# Altium PCB PCB Up.PcbDoc
Units mm, origin at the board's own origin, x right, y up, seen from the top; angles counter-clockwise.
Board outline 147.41 x 76.58 mm, 2 copper layers (Top Layer, Bottom Layer); 81 components, 70 nets, 547 pads, 147 vias.
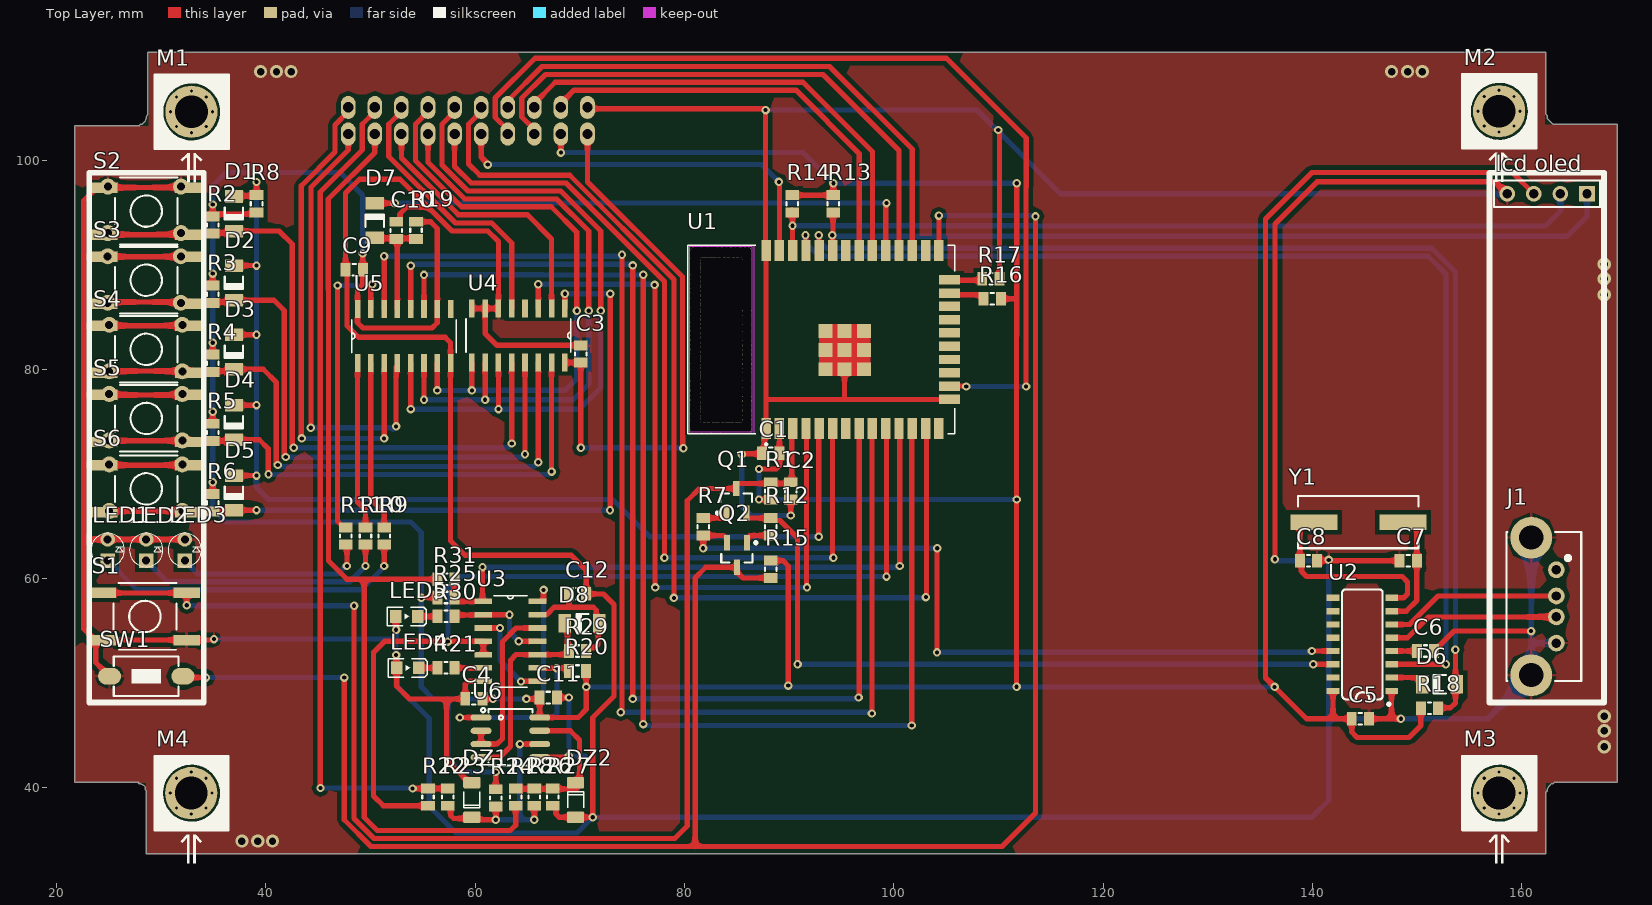
[diagram p0: Top Layer view]
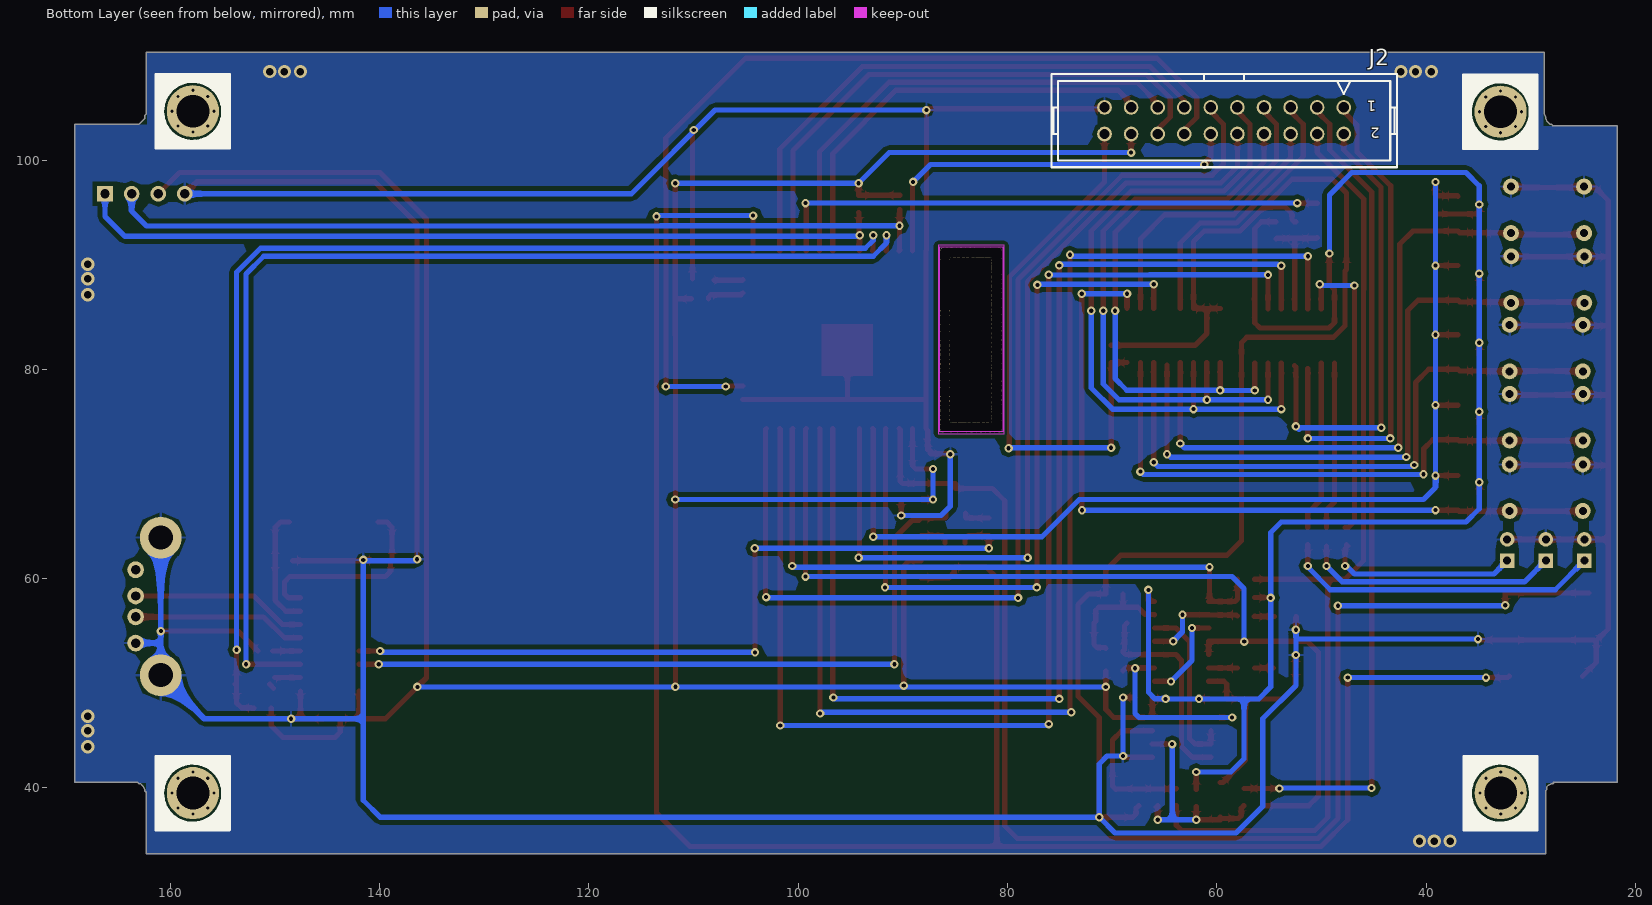
[diagram p1: Bottom Layer view, seen from below]
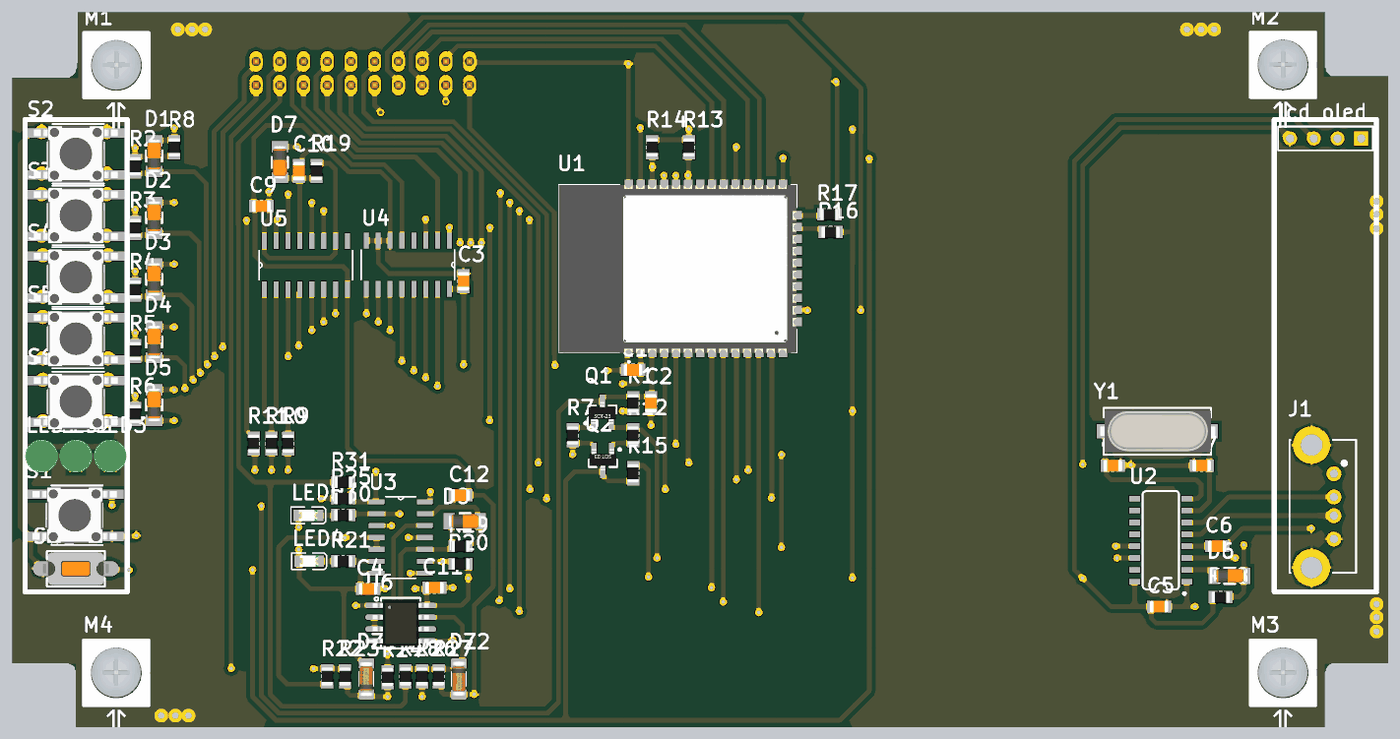
[diagram p2: 3D render of the assembled board from above, using the file's embedded part models]

## Layer stack, top to bottom
Top Solder: solder mask 0.0102, Solder Resist, Dk 3.5
Top Layer: signal copper 0.0356
Dielectric 1: dielectric 0.32, FR-4, Dk 4.8
Bottom Layer: signal copper 0.0356
Bottom Solder: solder mask 0.0102, Solder Resist, Dk 3.5

## Board outline
27.911,40.411 28.048,40.411 28.321,40.275 28.458,40.138 28.458,39.864 28.595,39.727 28.595,33.698 162.306,33.698 162.306,39.587 162.446,39.727 162.446,39.864 162.582,40.138 162.719,40.275 162.856,40.411 162.992,40.411 163.129,40.548 169.156,40.548 169.156,103.431 162.992,103.431 162.856,103.568 162.719,103.704 162.582,103.841 162.446,103.978 162.446,104.252 162.306,104.389 162.306,110.281 28.732,110.281 28.732,104.389 28.595,104.115 28.595,103.978 28.458,103.704 28.321,103.568 28.184,103.431 28.048,103.431 27.911,103.294 21.745,103.294 21.745,40.548 27.774,40.548
cut-out: 86.487,91.693 80.439,91.693 80.439,74.041 86.487,74.041

## Design rules (kind name [scope] priority, off if disabled: settings)
Clearance [All] p1: gap=0.254 ignorepadtopadclearanceinfootprint=FALSE except(0: Arc-Hole Track-Hole SMDPad-Hole THPad-Hole Via-Hole Fill-Hole Poly-Hole Region-Hole Text-Hole; 0.4: Arc-Fill Arc-Poly Arc-Region Track-Fill Track-Poly Track-Region SMDPad-Fill SMDPad-Poly SMDPad-Region THPad-Fill THPad-Poly THPad-Region Via-Fill Via-Poly Via-Region Fill-Fill Fill-Poly Fill-Region Poly-Poly Poly-Region Region-Region)
PolygonConnect [All] p1: connectstyle=Relief reliefconductorwidth=0.254 reliefentries=4 polygonreliefangle="90 Angle" airgapwidth=0.254
RoutingVias [All] p1: holewidth=0.4 width=0.8 viastyle="Through Hole" minholewidth=0.4 minwidth=0.8 maxholewidth=0.4 maxwidth=0.8
SolderMaskExpansion [All] p1: expansion=0.102 istentingtop=FALSE
Width [All] p1: maxlimit=0.5 minlimit=0.5 preferedwidth=0.5 minimp=50.000000 maximp=50.000000 favimp=50.000000
30 further rules are at their usual default settings.

## Components (designator, comment, footprint, x,y, rotation, side; value= is the part's Value field where it differs from the comment)
C1 "100nF" CAP805 89.076,71.98 r180 top
C2 "100nF" CAP805 90.17,69.215 r270 top
C3 "100nF" CAP805 70.104,80.646 r90 top
C4 "100nF" CAP805 60.706,48.514 r180 top
C5 "100nF" CAP805 145.415,46.609 r180 top
C6 "0.1nF" CAP805 151.637,53.086 r180 top
C7 "22pF" CAP805 148.336,61.722 r0 top
C8 "22pF" CAP805 140.462,61.722 r180 top
C9 "100nF" CAP805 49.276,89.535 r180 top
C10 "100nF" CAP805 52.451,94.106 r270 top
C11 "100nF" CAP805 66.168,48.641 r0 top
C12 "33pF" CAP805 68.962,58.547 r0 top value=100nF
D1 "4148" "Diode 1n4148 SMD" 36.957,96.518 r270 top
D2 "4148" "Diode 1n4148 SMD" 36.957,89.914 r270 top
D3 "4148" "Diode 1n4148 SMD" 36.957,83.31 r270 top
D4 "4148" "Diode 1n4148 SMD" 36.957,76.581 r270 top
D5 "4148" "Diode 1n4148 SMD" 36.957,69.848 r270 top
D6 "4148" "Diode 1n4148 SMD" 153.795,49.911 r180 top
D7 "4148" "Diode 1n4148 SMD" 50.419,92.582 r90 top
D8 "4148" "Diode 1n4148 SMD" 71.88,55.753 r180 top
DZ1 "" "SOD80, LL-34" 59.69,38.862 r90 top value=12V
DZ2 "" "SOD80, LL-34" 69.596,38.862 r270 top value=12V
J1 "USB1040-XX-X-X_REVC" GCT_USB1040-XX-X-X_REVC 160.922,57.348 r270 top
J2 "IDC_2X10" IDC_2X10 59.309,103.759 r0 bottom
"lcd oled" "Header 4" HDR1X4 166.243,96.774 r180 top
LED1 "RED" LED3mm_GRN 24.892,62.738 r90 top
LED2 "RED" LED3mm_GRN 28.575,62.738 r90 top
LED3 "RED" LED3mm_GRN 32.258,62.738 r90 top
LED4 "LED RXD2" LED_SMD_0805 53.56,51.473 r180 top
LED5 "LED TXD2" LED_SMD_0805 53.467,56.388 r180 top
M1 "Screw" "Board Screw" 32.893,104.616 r0 top
M2 "Screw" "Board Screw" 157.844,104.665 r0 top
M3 "Screw" "Board Screw" 157.844,39.514 r0 top
M4 "Screw" "Board Screw" 32.876,39.514 r0 top
Q1 "SS8050-G" SOT23_BEC_M 84.963,67.437 r90 top
Q2 "SS8050-G" SOT23_BEC_M 85.024,62.262 r270 top
R1 "10K" RES0805_(2012X06L) 88.265,69.215 r270 top
R2 "10K" RES0805_(2012X06L) 34.925,94.614 r270 top
R3 "10K" RES0805_(2012X06L) 34.925,88.01 r270 top
R4 "10K" RES0805_(2012X06L) 34.925,81.406 r270 top
R5 "10K" RES0805_(2012X06L) 34.925,74.803 r270 top
R6 "10K" RES0805_(2012X06L) 34.925,68.071 r270 top
R7 "10K" RES0805_(2012X06L) 81.788,64.135 r90 top
R8 "10K" RES0805_(2012X06L) 39.116,96.647 r270 top
R9 "2.2K" RES0805_(2012X06L) 51.308,63.246 r90 top
R10 "2.2K" RES0805_(2012X06L) 49.53,63.246 r90 top
R11 "2.2K" RES0805_(2012X06L) 47.625,63.246 r90 top
R12 "10K" RES0805_(2012X06L) 88.265,65.785 r270 top
R13 "10K" RES0805_(2012X06L) 94.234,96.646 r270 top
R14 "10K" RES0805_(2012X06L) 90.297,94.996 r90 top
R15 "10K" RES0805_(2012X06L) 88.265,60.071 r90 top
R16 "10K" RES0805_(2012X06L) 108.585,86.741 r0 top
R17 "10K" RES0805_(2012X06L) 108.459,88.646 r0 top
R18 "" RES0805_(2012X06L) 150.368,47.625 r0 top
R19 "10K" RES0805_(2012X06L) 54.356,94.107 r270 top
R20 "4.6K" RES0805_(2012X06L) 70.611,51.181 r180 top
R21 "2.4K" RES0805_(2012X06L) 58.039,51.473 r180 top
R22 "1K" RES0805_(2012X06L) 55.499,39.952 r270 top
R23 "100" RES0805_(2012X06L) 57.404,39.952 r270 top
R24 "20K" RES0805_(2012X06L) 61.976,38.228 r90 top
R25 "4.6K" RES0805_(2012X06L) 56.389,58.204 r0 top
R26 "120" RES0805_(2012X06L) 65.659,39.952 r270 top
R27 "20K" RES0805_(2012X06L) 67.437,38.302 r90 top
R28 "100" RES0805_(2012X06L) 63.881,38.302 r90 top
R29 "56K" RES0805_(2012X06L) 68.961,53.086 r0 top
R30 "2.4K" RES0805_(2012X06L) 58.039,56.426 r180 top
R31 "1K" RES0805_(2012X06L) 58.039,59.944 r180 top
S1 "KEY_FLASH" SW-PB 28.448,56.388 r180 top
S2 "KEY1" SW-PB 28.575,95.123 r180 top
S3 "KEY1" SW-PB 28.575,88.519 r180 top
S4 "KEY1" SW-PB 28.575,81.915 r180 top
S5 "KEY1" SW-PB 28.575,75.311 r180 top
S6 "KEY1" SW-PB 28.575,68.58 r180 top
SW1 "PUSHBUTTON" SWPBS_SPST_6X3X5 28.575,50.673 r180 top
U1 "ESP32-WROOM-32D" ESP32_WROOM 95.827,81.899 r90 top
U2 "CH340" SO016 144.774,53.721 r90 top
U3 "74HC04" SOIC127P600X175-14N 63.373,54.013 r0 top
U4 "74HC4051D" SOIC127P600X175-16N 64.135,83.236 r270 top
U5 "74HC595D" SOIC127P600X175-16N 53.213,83.185 r90 top
U6 "MAX487CPA" SO_8 63.373,44.831 r0 top
Y1 "XTAL" "Crystal SMD" 144.399,65.405 r180 top

## Footprints (in the part's own frame and the unit in brackets; to place one, negate y for a bottom-side part, rotate by r counter-clockwise, add the part's x,y. Pads: shape width x height; smd on the part's side, far side on the other; paste and mask are expansions set on the pad)
"Board Screw" [mm]
  round 0.6 hole 0.3: S(-2,0) S(-1.414,-1.414) S(-1.414,1.414) S(0,-2) S(0,2) S(1.414,-1.414) S(1.414,1.414) S(2,0)
  round 5 hole 3.15 mask+0.1: S(0,0)
  silkscreen extent -3.49,-6.75 3.56,3.52, body extent -2.67,-2.64 2.69,2.72, height 2.34
CAP805 [mm]
  rect 0.95x1.3 smd: 1(0,0) 2(1.65,0)
  silkscreen extent 0.67,-0.55 0.97,0.55, body extent -0.19,-0.63 1.84,0.63, height 0.65
"Crystal SMD" [mm] "DESIGNER ABBAS BASEREH"
  rect 4.5x1.5 smd: 1(-4.25,0) 2(4.25,0)
  silkscreen extent -5.75,-2.5 5.75,2.5, body extent -6.21,-2.25 6.09,2.25, height 5.18
"Diode 1n4148 SMD" [mm] "Mini MELF SOD-80"
  rect 1.2x1.75 smd: 1(0,0) 2(3.3,0)
  silkscreen extent 1.04,-0.88 2.22,0.87, body extent -0.13,-0.75 3.37,0.75, height 1.55
ESP32_WROOM [mm]
  rect 2x0.9 smd: 1(-7.554,8.02) 2(-7.554,6.75) 3(-7.554,5.48) 4(-7.554,4.21) 5(-7.554,2.94) 6(-7.554,1.67) 7(-7.554,0.4) 8(-7.554,-0.87) 9(-7.554,-2.14) 10(-7.554,-3.41) 11(-7.554,-4.68) 12(-7.554,-5.95) 13(-7.554,-7.22) 14(-7.554,-8.49) 25(9.446,-8.49) 26(9.446,-7.22) 27(9.446,-5.95) 28(9.446,-4.68) 29(9.446,-3.41) 30(9.446,-2.14) 31(9.446,-0.87) 32(9.446,0.4) 33(9.446,1.67) 34(9.446,2.94) 35(9.446,4.21) 36(9.446,5.48) 37(9.446,6.75) 38(9.446,8.02)
  rect 0.9x2 smd: 15(-4.769,-9.49) 16(-3.499,-9.49) 17(-2.229,-9.49) 18(-0.959,-9.49) 19(0.311,-9.49) 20(1.581,-9.49) 21(2.851,-9.49) 22(4.121,-9.49) 23(5.391,-9.49) 24(6.661,-9.49)
  rect 1.33x1.33 smd: 39(-1.889,-1.315) 39(-1.889,0.52) 39(-1.889,2.355) 39(-0.054,2.355) 39(-0.054,0.52) 39(-0.054,-1.315) 39(1.781,-1.315) 39(1.781,0.52) 39(1.781,2.355)
  Keep-Out Layer region: 9.946,9.21 -8.054,9.21 -8.054,15.51 9.946,15.51
  Keep-Out Layer region: 9.946,9.21 -8.054,9.21 -8.054,15.51 9.946,15.51
  silkscreen extent -9.15,-9.99 9.95,15.51, body extent -8.1,-9.95 9.9,15.55, height 3.2
GCT_USB1040-XX-X-X_REVC [mm]
  round 1.6 hole 0.9: 1(-3.5,2.4) 2(-1,2.4) 3(1,2.4) 4(3.5,2.4)
  round 4 hole 2.3: 5(-6.57,0) 6(6.57,0)
  silkscreen extent -7.11,-2.36 7.11,4.78
HDR1X4 [mm] "Connector; Header; 4 Position"
  rect 1.5x1.5 hole 0.9: 1(0,0)
  round 1.5 hole 0.9: 2(2.54,0) 3(5.08,0) 4(7.62,0)
  silkscreen extent -1.27,-1.27 8.89,1.27
IDC_2X10 [mm]
  round 1.4 / inner round 1.4 / far side oval 1.4x2.2 hole 1 mask+0.1: 1(-11.43,-1.27) 2(-11.43,1.27) 3(-8.89,-1.27) 4(-8.89,1.27) 5(-6.35,-1.27) 6(-6.35,1.27) 7(-3.81,-1.27) 8(-3.81,1.27) 9(-1.27,-1.27) 10(-1.27,1.27) 11(1.27,-1.27) 12(1.27,1.27) 13(3.81,-1.27) 14(3.81,1.27) 15(6.35,-1.27) 16(6.35,1.27) 17(8.89,-1.27) 18(8.89,1.27) 19(11.43,-1.27) 20(11.43,1.27)
  silkscreen extent -16.51,-4.44 16.51,4.44, body extent -16.53,-4.42 16.53,4.75, height 9.13
LED3mm_GRN [mil]
  rect 55x55 hole 30: 1(-40,0)
  round 55 hole 30: 2(40,0)
  silkscreen extent -63,-63 63,63, body extent -69,-69 69,69, height 154
LED_SMD_0805 [mm] "SMD Mono-color Chip LED, body 2.0x1.25mm"
  rect 1.1x1.2 smd: 1(-1.05,0) 2(1.05,0)
  silkscreen extent -1.85,-0.88 1.85,0.88, body extent -1,-0.62 1,0.63, height 0.7
RES0805_(2012X06L) [mm] "Chip Resistor, 2-Leads, Body 2.0x1.3mm, IPC High Density _ (0.100 W)"
  rect 0.95x1.3 smd: 1(0,0) 2(1.65,0)
  silkscreen extent 0.67,-0.55 0.97,0.55, body extent -0.19,-0.63 1.84,0.64, height 0.6
SO016 [mm]
  rect 0.6x1.2 smd: 1(-4.445,-2.8) 2(-3.175,-2.8) 3(-1.905,-2.8) 4(-0.635,-2.8) 5(0.635,-2.8) 6(1.905,-2.8) 7(3.175,-2.8) 8(4.445,-2.8) 9(4.445,2.8) 10(3.175,2.8) 11(1.905,2.8) 12(0.635,2.8) 13(-0.635,2.8) 14(-1.905,2.8) 15(-3.175,2.8) 16(-4.445,2.8)
  silkscreen extent -5.84,-2.67 5.26,1.95
SO_8 [mm] "SOP-8, 5x3.9mm body 1.27mm pitch, SOT96-1, M08A, S8, SOIC8, VO8, MS-012AA(JEDEC), R-8, 8S2, VOG8"
  oval 2x0.6 smd: 1(-2.8,1.905) 2(-2.8,0.635) 3(-2.8,-0.635) 4(-2.8,-1.905) 5(2.8,-1.905) 6(2.8,-0.635) 7(2.8,0.635) 8(2.8,1.905)
  silkscreen extent -2.8,-2.7 2.1,2.8, body extent -3,-2.45 3,2.45, height 1.7
"SOD80, LL-34" [mm] "Diode, MiniMELF"
  round 0.5 on Mech15: 0(0,0)
  rrect25% 1.1x1.65 smd: 1(1.65,0) 2(-1.65,0)
  silkscreen extent -0.76,-0.76 0.76,0.76, body extent -1.88,-0.8 1.82,0.8, height 1.6
SOIC127P600X175-14N [mil]
  rect 67x21 smd: 1(-102,150) 2(-102,100) 3(-102,50) 4(-102,0) 5(-102,-50) 6(-102,-100) 7(-102,-150) 8(102,-150) 9(102,-100) 10(102,-50) 11(102,0) 12(102,50) 13(102,100) 14(102,150)
  silkscreen extent -63,-172 63,172
SOIC127P600X175-16N [mil]
  rect 67x21 smd: 1(-102,175) 2(-102,125) 3(-102,75) 4(-102,25) 5(-102,-25) 6(-102,-75) 7(-102,-125) 8(-102,-175) 9(102,-175) 10(102,-125) 11(102,-75) 12(102,-25) 13(102,25) 14(102,75) 15(102,125) 16(102,175)
  silkscreen extent -62,-197 62,197
SOT23_BEC_M [mm] "SOT23, 3-Leads, Body 2.9x1.3mm, Pitch 0.95mm, Lead Span 2.4mm, IPC Low Density"
  rect 1.45x0.6 smd: 1(-1.175,0.95) 2(-1.175,-0.95) 3(1.175,0)
  silkscreen extent -1.3,-1.5 0.7,1.92, body extent -1.23,-1.45 1.07,1.45, height 1
SW-PB [mm]
  rect 2.5x1 smd: 1(-3.992,2.25) 1(3.992,2.25) 2(-3.992,-2.25) 2(3.992,-2.25)
  silkscreen extent -3,-3.2 3,3.18, body extent -4.5,-3 4.5,3, height 5
SWPBS_SPST_6X3X5 [mm] "SWITCH, PUSHBUTTON, SMD, SPST, 6X3.5mm, SKQMBBE010, 50000 Cycles, 1.57N Force"
  oval 2.2x1.6 smd mask+0.1: 1(-3.5,0) 2(3.5,0)
  silkscreen extent -3.1,-1.9 3.1,1.9, body extent -3.65,-1.75 3.65,1.75, height 5

## Part data
C1 C2 C3 C4 C9 C10 C11 C12: library part "CAP SMD PACKAGE", "TOTAL CAPACITOR SMD PACK", Data=2017-3-10, Desc.="CAP SMD TOTAL PACKAGES", Designer="Abbas Basereh"
C5 C6 C7 C8: library part Cap-Bipolar, "Bipolar Capacitor", Voltage=100V, Adding Date=1387/12/20, Designer="Saeid Jorablo", Organazation=ControTec
D1 D2 D3 D4 D5 D6 D7 D8: library part Diode, "Default Diode", Code_JEDEC=DO-214-AB, LatestRevisionDate=17-Jul-2002, LatestRevisionNote="Re-released for DXP Platform.", PackageDescription="DO-214-AB/SMC; 2 C-Bend Leads; Body 7.9 x 5.9 mm, inc. leads (LxW)", PackageReference=SMC, PackageVersion=Sep-1996, Published=8-Jun-2000, Publisher="Altium Limited"
DZ1 DZ2: library part "ZENER GENERAL DIODE", "DIODE ZENER GENERAL", ComponentLink1Description="Manufacturer Link", ComponentLink2Description=Datasheet, PackageDescription="DIODE GEN ZENER", PackageReference="DO 35", PackageVersion=2017-1-12, Published=2017-1-12, Publisher="Abbas Basereh"
J1: "USB-A _USB TYPE-A_ USB 2.0 Receptacle Connector 4 Position Through Hole", Package=None, Availability=Unavailable, MF="Global Connector Technology", MP=USB1040-GF-L-B, Price=None, SnapEDA_Link=https://www.snapeda.com/parts/USB1040-GF-L-B/Global%20Connector%20Technology/view-part/812880/?ref=snap
J2: "CONN, IDC, Male, pitch: 2.54mm, 20POS"
"lcd oled": "Header, 4-Pin", LatestRevisionDate=17-Jul-2002, LatestRevisionNote="Re-released for DXP Platform.", Publisher="Altium Limited"
LED1 LED2 LED3 LED4 LED5: library part LED, "LED", Adding Date=1387/12/22, Designer="Saeid Jorablo", Organazation=ControTec, Size="SMD 1206"
  LED1 LED2 LED3: Color=RED
  LED4: Color="LED RXD2"
  LED5: Color="LED TXD2"
M1 M2 M3 M4: library part "Board Screw 3MM", "Board Screw With Spacer"
Q1 Q2: "Bipolar _BJT_ Transistor NPN 25V 1.5A 100MHz 300mW Surface Mount SOT-23", Package="TO-236 Comchip", Availability=Unavailable, MF="Comchip Technology", MP=SS8050-G, Price=None, SnapEDA_Link=https://www.snapeda.com/parts/SS8050-G/Comchip%20Technology/view-part/809142/?ref=snap
R1 R2 R3 R4 R5 R6 R7 R8 R12 R13 R14 R15 R16 R17 R19 R20 R21 R22 R23 R24 R25 R26 R27 R28 R29 R30 R31: library part "RES SMD PACKAGE", "TOTAL SMD RESISTOR PACK", Data=2017-3-10, Desc.="RES SMD PAKAGES", Designer="Abbas Basereh"
R9 R10 R11 R18: library part "RES SMD PACKAGE", "TOTAL SMD RESISTOR PACK(1206)", Data=2017-3-10, Desc.="RES SMD PAKAGES", Designer="Abbas Basereh"
S1 S2 S3 S4 S5 S6: library part PB-2pin, "Switch", Designer="Seyed Mohsen Ghasemian", E-mail=picpars@gmail.com, Publisher=www.picpars.com, WEB=www.picpars.com
SW1: library part SWPBS_SPST_6X3_222BMVBAR, "SWITCH, PUSH BUTTON, TACTILE, SMD, SPST, 6X3.5X5mm", =http://www.chila.ir, ASSEMBLY=ASSEMBLY, DESC=DESCRIPTION, MANF=CTS, MANF_P#=222BMVBAR, PARAM=PARAM, Price=PRICE
U1: "IC: SoC; GPIO, I2C, I2S, IR, SD, SDIO, SPI, UART; 2.7÷3.6VDC; 20dBm", Package="Module Espressif Systems", Availability=Unavailable, MF="Espressif Systems", MP=ESP32-WROOM-32D, Price=None, SnapEDA_Link=https://www.snapeda.com/parts/ESP32-WROOM-32D/Espressif%20Systems/view-part/?ref=snap
U2: Package=None, Availability=Unavailable, MF="Seeed Technology", MP=CH340, Price=None, SnapEDA_Link=https://www.snapeda.com/parts/CH340/Seeed%20Technology%20Co.%2C%20Ltd/view-part/?ref=snap
U3: library part NOTx6_SN74HC04, "Inverter IC Logic-level 6 section SOP-14 SMD", MANF="Texas Instruments", MANF_P#=SN74HC04NSR, PARAM="5.2mA, 5.2mA", PARAM2="2 V ~ 6 V"
U4: "Single 8-Channel Analog Multiplexer/Demultiplexer, VCC=2 to 6V, PD=500mW, tpd/tpz=15ns_typ._", Package="SOIC-16 Toshiba", Availability=Unavailable, MF="Toshiba Semiconductor", MP=74HC4051D, Price=None, SnapEDA_Link=https://www.snapeda.com/parts/74HC4051D/Toshiba%20Semiconductor%20and%20Storage/view-part/?ref=snap
U5: "Shift Register Single 8-Bit Serial to Serial/Parallel 16-Pin SO", Package="SO-16 NXP Semiconductors", Availability=Good, MF="Toshiba Semiconductor", MP=74HC595D, Price="0.21 USD", SnapEDA_Link=https://www.snapeda.com/parts/74HC595D/Toshiba%20Semiconductor%20and%20Storage/view-part/?ref=snap
U6: "Low-Power, Slew-Rate-Limited RS-485/RS-422 Transceiver", Code_JEDEC=MS-001-AB, ComponentLink1Description="Manufacturer Link", ComponentLink1URL=http://www.maxim-ic.com/, ComponentLink2Description=Datasheet, ComponentLink2URL=http://pdfserv.maxim-ic.com/en/ds/MAX1487-MAX491.pdf, DatasheetVersion=Feb-1996, LatestRevisionDate=29-May-2009, LatestRevisionNote="Component Body Added.", PackageDescription="DIP, 8-Pin, Row Spacing 7.62 mm, Pitch 2.54 mm", PackageReference=PA8, PackageVersion="RevB, 21-0043", Published=16-Jan-2001, Publisher="Altium Limited"
Y1: "Crystal Oscillator", LatestRevisionDate=17-Jul-2002, LatestRevisionNote="Re-released for DXP Platform.", PackageDescription="Crystal, Thru-Hole; 2 Leads; Body 3.1 x 8.2 mm (Dia.xH)", PackageReference=R38, Published=8-Jun-2000, Publisher="Altium Limited"

## Free pads (board coordinates)
  round 1 hole 1: 0(81.026,74.422) 0(81.026,74.549) 0(81.026,74.676) 0(81.026,74.93) 0(81.026,75.311) 0(81.026,75.565) 0(81.026,75.565) 0(81.026,75.946) 0(81.026,76.2) 0(81.026,76.454) 0(81.026,76.454) 0(81.026,76.835) 0(81.026,77.343) 0(81.026,77.343) 0(81.026,77.724) 0(81.026,78.232) 0(81.026,78.232) 0(81.026,78.613) 0(81.026,79.121) 0(81.026,79.375) 0(81.026,79.502) 0(81.026,79.502) 0(81.026,79.756) 0(81.026,80.137) 0(81.026,80.391) 0(81.026,80.391) 0(81.026,80.772) 0(81.026,81.026) 0(81.026,81.28) 0(81.026,81.28) 0(81.026,81.661) 0(81.026,82.169) 0(81.026,82.169) 0(81.026,82.55) 0(81.026,83.058) 0(81.026,83.058) 0(81.026,83.439) 0(81.026,83.947) 0(81.026,84.328) 0(81.026,84.709) 0(81.026,84.836) 0(81.026,85.09) 0(81.026,85.471) 0(81.026,85.725) 0(81.026,85.725) 0(81.026,86.106) 0(81.026,86.233) 0(81.026,86.36) 0(81.026,86.614) 0(81.026,86.614) 0(81.026,86.614) 0(81.026,86.995) 0(81.026,87.122) 0(81.026,87.503) 0(81.026,87.503) 0(81.026,87.503) 0(81.026,87.503) 0(81.026,87.884) 0(81.026,88.011) 0(81.026,88.392) 0(81.026,88.392) 0(81.026,88.392) 0(81.026,88.392) 0(81.026,88.773) 0(81.026,88.9) 0(81.026,89.281) 0(81.026,89.281) 0(81.026,89.281) 0(81.026,89.535) 0(81.026,89.662) 0(81.026,89.789) 0(81.026,89.916) 0(81.026,90.17) 0(81.026,90.17) 0(81.026,90.424) 0(81.026,90.805) 0(81.026,90.805) 0(81.026,91.059) 0(81.026,91.186) 0(81.026,91.186) 0(81.153,91.186) 0(81.407,74.422) 0(81.407,91.186) 0(81.788,91.186) 0(81.915,74.422) 0(82.042,91.186) 0(82.042,91.186) 0(82.296,74.422) 0(82.296,74.422) 0(82.423,91.186) 0(82.677,91.186) 0(82.804,74.422) 0(82.931,91.186) 0(82.931,91.186) 0(83.185,74.422) 0(83.185,74.422) 0(83.312,91.186) 0(83.693,74.422) 0(83.82,91.186) 0(83.82,91.186) 0(84.074,74.422) 0(84.074,74.422) 0(84.201,91.186) 0(84.328,74.422) 0(84.582,74.422) 0(84.709,91.186) 0(84.709,91.186) 0(84.963,74.422) 0(84.963,74.422) 0(85.09,91.186) 0(85.217,74.422) 0(85.598,74.422) 0(85.598,91.186) 0(85.852,74.422) 0(85.979,74.422) 0(85.979,74.549) 0(85.979,74.93) 0(85.979,75.438) 0(85.979,75.819) 0(85.979,75.819) 0(85.979,76.327) 0(85.979,76.708) 0(85.979,76.708) 0(85.979,77.216) 0(85.979,77.597) 0(85.979,77.597) 0(85.979,77.851) 0(85.979,78.105) 0(85.979,78.486) 0(85.979,78.486) 0(85.979,78.74) 0(85.979,79.121) 0(85.979,79.375) 0(85.979,79.502) 0(85.979,79.883) 0(85.979,80.264) 0(85.979,80.772) 0(85.979,81.153) 0(85.979,81.153) 0(85.979,81.661) 0(85.979,82.042) 0(85.979,82.042) 0(85.979,82.55) 0(85.979,82.931) 0(85.979,82.931) 0(85.979,83.185) 0(85.979,83.439) 0(85.979,83.82) 0(85.979,83.82) 0(85.979,84.074) 0(85.979,84.455) 0(85.979,84.709) 0(85.979,84.836) 0(85.979,84.963) 0(85.979,85.344) 0(85.979,85.852) 0(85.979,86.106) 0(85.979,86.233) 0(85.979,86.233) 0(85.979,86.487) 0(85.979,86.741) 0(85.979,86.995) 0(85.979,87.122) 0(85.979,87.122) 0(85.979,87.376) 0(85.979,87.376) 0(85.979,87.63) 0(85.979,87.884) 0(85.979,88.011) 0(85.979,88.011) 0(85.979,88.265) 0(85.979,88.265) 0(85.979,88.265) 0(85.979,88.519) 0(85.979,88.773) 0(85.979,88.9) 0(85.979,88.9) 0(85.979,89.154) 0(85.979,89.154) 0(85.979,89.154) 0(85.979,89.408) 0(85.979,89.535) 0(85.979,89.662) 0(85.979,89.789) 0(85.979,89.916) 0(85.979,90.043) 0(85.979,90.043) 0(85.979,90.297) 0(85.979,90.678) 0(85.979,90.932) 0(85.979,91.059) 0(85.979,91.186)
  round 1.524 hole 0.762: 2(24.892,90.805) 2(24.911,97.466) 2(25.038,70.923) 2(25.038,77.654) 2(25.038,84.258) 3(31.877,90.805) 3(31.896,97.466) 3(32.023,70.923) 3(32.023,77.654) 3(32.023,84.258) 4(24.892,86.36) 4(24.911,93.021) 4(25.038,66.478) 4(25.038,73.209) 4(25.038,79.813) 5(31.877,86.36) 5(31.896,93.021) 5(32.023,66.478) 5(32.023,73.209) 5(32.023,79.813)

## Via types
v1: diameter 0.8, hole 0.4, Top Layer to Bottom Layer, 132 vias
v2: diameter 1.27, hole 0.711, Top Layer to Bottom Layer, 15 vias

## Nets (pads, with @x,y where several pads share a name; then routed paths per layer and width w, separated by ;. In a path a pad name is that pad's centre, name@x,y a point inside that pad or via, vN(x,y) a via of type N, cw(c..) or ccw(c..) an arc to the next point about the centre after c; other vN are vias at no path point)
3V3: "lcd oled.3" C1.1 C4.1 C5.2 C9.1 C11.1 J2.18 R1.2 R2.1 R3.1 R4.1 R5.1 R6.1 R8.2 R13.1 R14.2 R15.2 R16.2 R18.1 R19.1 R20.1 R24.2 R25.1 U1.2 U2.16 U3.14 U5.10 U5.16 U6.8 | length 483.6
  Top Layer w0.5: R6.1 v1(34.925,69.215) ; R5.1 v1(34.925,75.946) ; R4.1 v1(34.925,82.55) ; R3.1 v1(34.925,89.154) ; v1(34.925,95.758) R2.1 35.15,94.839 38.958,94.839 R8.2 ; v1(49.253,91.074) 49.264,91.062 49.264,89.547 C9.1 49.261,89.52 49.261,88.131 48.768,87.638 U5.16 48.768,84.455 49.276,83.947 55.88,83.947 56.388,84.455 56.388,93.472 55.753,94.107 R19.1 ; v1(54.864,58.166) 54.902,58.204 R25.1 ; C4.1 C4.1 v1(61.707,48.514) ; R24.2 v1(61.976,41.529) ; v1(64.897,48.514) 66.041,48.514 C11.1 ; U3.14 66.531,57.823 66.548,57.84 v1(66.548,58.928) ; C11.1@66.173,48.387 U6.8 69.85,46.736 70.611,47.497 R20.1 ; v1(68.199,100.711) J2.18 ; v1(87.122,67.564) 88.263,67.565 R1.2 ; v1(87.122,70.485) 88.773,70.485 89.077,70.789 89.077,71.979 C1.1 ; R15.2 89.409,61.721 89.916,61.214 v1(89.916,49.784) ; C1.1@89.077,72.234 U1.2 ; R14.2 R13.1 v1(94.234,97.79) ; R16.2 111.76,86.741 ; v1(111.745,49.672) 111.745,83.244 111.76,83.259 111.76,86.741 ; v1(111.76,97.79) 111.76,86.741 ; U2.16 141.974,46.609 ; R18.1 150.368,45.974 149.225,44.831 144.272,44.831 143.765,45.338 C5.2 141.974,46.609 ; 161.163,96.774 159.131,98.806 139.954,98.806 135.517,94.369 135.517,50.538 139.446,46.609 141.974,46.609
  Bottom Layer w0.5: v1(49.253,91.074) 49.253,96.67 47.117,98.806 36.195,98.806 34.925,97.536 v1(34.925,95.758) v1(34.925,89.154) v1(34.925,82.55) v1(34.925,75.946) v1(34.925,69.215) 34.925,66.675 36.195,65.405 53.848,65.405 54.864,64.389 v1(54.864,58.166) 54.864,49.657 56.007,48.514 57.404,48.514 ; v1(61.976,41.529) 58.674,41.529 57.404,42.799 57.404,48.514 ; v1(66.548,58.928) 66.548,49.149 65.913,48.514 v1(64.897,48.514) v1(61.707,48.514) 57.404,48.514 ; v1(68.199,100.711) 91.313,100.711 v1(94.234,97.79) v1(111.76,97.79) ; v1(70.612,49.657) v1(136.398,49.657) ; v1@87.122,70.358 v1(87.122,67.564) v1(111.76,67.564)
5V: C3.1 J2.20 U4.16 | length 53.3
  Top Layer w0.5: U4.16 U4.16 C3.1 v1(70.104,72.517) ; J2.20 70.739,97.917 79.813,88.843 79.813,73.636 79.841,73.609 79.841,72.517 v1(79.898,72.46)
  Bottom Layer w0.5: v1(70.104,72.517) 79.841,72.517 v1(79.898,72.46)
4051_CT_Output: J2.10 U1.6 | length 82.6
  Top Layer w0.5: J2.10 58.039,99.391 59.632,97.798 68.699,97.798 78.098,88.399 78.098,62.028 78.09,62.02 v1(78.09,62.006) ; U1.6 94.157,62.083 v1(94.234,62.006)
  Bottom Layer w0.5: v1(78.09,62.006) 94.174,62.006 94.204,61.976 v1(94.234,62.006)
4051_Interrupt_Output: U1.4 U4.3 | length 72.1
  Top Layer w0.5: U4.3 v1(66.04,88.138) ; v1(77.148,88.07) 77.186,88.033 77.186,59.197 v1(77.216,59.167) ; U1.4 91.663,74.299 91.663,59.213 v1(91.709,59.167)
  Bottom Layer w0.5: v1(66.04,88.138) 77.014,88.138 77.082,88.07 v1(77.148,88.07) ; v1(77.216,59.167) 77.231,59.182 77.246,59.167 v1(91.709,59.167)
A: J2.9 U4.11 U5.5 | length 66.5
  Top Layer w0.5: v1(53.848,76.2) U5.5 ; J2.9 58.039,104.629 56.835,103.425 56.835,99.528 59.319,97.044 68.183,97.044 72.009,93.218 v1(72.009,85.598) ; v1(62.23,76.2) U4.11
  Bottom Layer w0.5: v1(53.848,76.2) v1(62.23,76.2) 69.977,76.2 72.009,78.232 v1@72.009,85.471
B: J2.8 U4.10 U5.6 | length 58.6
  Top Layer w0.5: v1(55.118,77.104) U5.6 ; J2.8 55.499,99.798 59.007,96.29 67.794,96.29 70.866,93.218 v1(70.866,85.598) ; v1(60.96,77.104) U4.10
  Bottom Layer w0.5: v1(55.118,77.104) 55.133,77.089 60.945,77.089 v1(60.96,77.104) 69.357,77.104 70.866,78.613 v1@70.866,85.439
"Boost control": J2.16 U1.28 | length 53.5
  Top Layer w0.5: J2.16 65.659,102.926 64.455,104.13 64.455,105.928 66.715,108.188 93.234,108.188 100.507,100.915 U1.28
C: J2.7 U4.9 U5.7 | length 56.9
  Top Layer w0.5: J2.7 55.499,104.629 54.295,103.425 54.295,99.936 58.695,95.536 67.278,95.536 69.723,93.091 v1(69.723,85.598) ; v1(56.388,77.993) U5.7 ; v1(59.69,77.993) U4.9
  Bottom Layer w0.5: v1(56.388,77.993) v1(59.69,77.993) 59.933,77.993 59.948,78.008 68.61,78.008 69.723,79.121 v1(69.723,85.598)
CS: J2.11 U1.13 | length 100.8
  Top Layer w0.5: J2.11 60.579,104.629 59.375,103.425 59.375,99.629 60.452,98.552 69.038,98.552 78.994,88.596 v1(78.994,58.166) ; U1.13 103.124,74.268 103.124,58.293 v1(103.073,58.242)
  Bottom Layer w0.5: v1(78.994,58.166) 102.997,58.166 v1(103.073,58.242)
D_N: J1.2 U2.6 | length 16.9
  Top Layer w0.5: U2.6 149.302,55.626 152.024,58.348 J1.2
D_P: J1.3 U2.5 | length 16.6
  Top Layer w0.5: U2.5 149.098,54.356 151.09,56.348 J1.3
DIN: J2.12 U1.37 | length 38.1
  Top Layer w0.5: J2.12 60.579,100.284 61.214,99.649 v1(61.214,99.568) ; U1.37 v1@89.077,97.74
  Bottom Layer w0.5: v1(61.214,99.568) 87.376,99.568 v1(89.027,97.917)
DIn1: J2.5 U4.5 | length 26.6
  Top Layer w0.5: J2.5 52.959,104.629 51.755,103.425 51.755,100.343 58.118,93.98 61.595,93.98 63.5,92.075 U4.5
DIn2: J2.6 U4.2 | length 26.5
  Top Layer w0.5: J2.6 52.959,100.205 58.382,94.782 64.984,94.782 67.31,92.456 U4.2
DOUT: J2.17 U1.31 | length 41.2
  Top Layer w0.5: J2.17 68.199,105.429 69.45,106.68 90.654,106.68 96.697,100.637 U1.31
Dout1: J2.1 U5.3 | length 48.1
  Top Layer w0.5: v1(43.434,73.406) 43.397,73.443 43.397,97.549 46.609,100.761 46.609,103.359 47.879,104.629 J2.1 ; U5.3@51.304,80.09 51.308,80.086 v1(51.308,73.406)
  Bottom Layer w0.5: v1(43.434,73.406) v1(51.308,73.406)
Dout2: J2.2 U5.4 | length 43.7
  Top Layer w0.5: v1(44.301,74.422) 44.323,74.444 44.323,97.409 47.879,100.965 J2.2 ; v1(52.451,74.549) 52.451,80.213 U5.4@52.578,80.34
  Bottom Layer w0.5: v1(44.301,74.422) 51.978,74.422 52.151,74.249 v1(52.451,74.549)
DS: U1.9 U5.14 | length 122.9
  Top Layer w0.5: U5.14 v1(51.308,90.805) ; v1(73.914,47.244) 73.914,47.325 74.041,47.452 v1(74.041,90.947) ; v1(97.917,47.117) 97.917,74.295 U1.9
  Bottom Layer w0.5: v1(51.308,90.805) 73.818,90.805 73.96,90.947 v1(74.041,90.947) ; v1(73.914,47.244) 97.79,47.244 v1(97.917,47.117)
DTR: Q2.2 R7.1 U2.13 | length 74.3
  Top Layer w0.5: v1(81.788,62.91) R7.1 83.731,64.135 83.954,63.912 84.024,63.912 84.074,63.862 Q2.2 ; v1(104.14,52.959) 104.14,62.882 v1(104.168,62.91) ; v1(139.954,53.086) U2.13
  Bottom Layer w0.5: v1(81.788,62.91) v1(104.168,62.91) ; v1(104.14,52.959) 139.827,52.959 v1(139.954,53.086)
EN: C2.1 Q1.3 R1.1 S1.2 U1.3 | length 125.9
  Top Layer w0.5: S1.2@24.456,58.638 32.44,58.638 v1(32.44,57.459) ; v1(48.435,57.404) 48.435,37.086 50.342,35.179 79.071,35.179 80.272,36.38 80.272,67.445 81.439,68.612 Q1.3 84.988,68.637 84.988,69.062 85.013,69.087 85.438,69.087 85.439,69.088 88.265,69.088 90.043,69.088 C2.1 90.259,69.304 90.259,74.257 U1.3
  Bottom Layer w0.5: v1(32.44,57.459) 32.385,57.404 v1(48.435,57.404)
EN_74595: D7.2 U1.29 | length 53.4
  Top Layer w0.5: D7.2 v1(52.321,95.882) ; U1.29 v1@99.237,95.885
  Bottom Layer w0.5: v1(52.321,95.882) 52.324,95.885 v1(99.314,95.885)
GND: "lcd oled.4" C1.2 C2.2 C3.2 C4.2 C5.1 C6.1 C7.1 C8.1 C9.2 C10.1 C11.2 C12.2 DZ1.1 DZ2.1 J1.4 J1.5 J1.6 J2.19 LED1.2 LED2.2 LED3.2 LED4.2 LED5.2 pad.2 pad.3 R17.2 R27.1 S1.1 S2.2 S3.2 S4.2 S5.2 S6.2 SW1.2 U1.1 U1.15 U1.38 U1.39 U2.1 U3.7 U4.6 U4.7 U4.8 U5.8 U6.5 | length 745.3
  Top Layer w0.5: SW1.2 25.073,50.673 24.565,51.181 24.565,51.183 23.749,51.999 S1.1@23.749,53.888 ; LED3.2 LED2.2 LED1.2 22.606,63.754 ; S6.2@32.567,70.83 24.583,70.83 22.642,70.83 22.606,70.866 ; S5.2@32.567,77.561 24.583,77.561 22.697,77.561 22.606,77.47 ; S4.2@32.567,84.165 24.583,84.165 22.697,84.165 22.606,84.074 ; S3.2@32.567,90.769 24.583,90.769 22.697,90.769 22.606,90.678 ; S2.2@32.567,97.373 24.583,97.373 23.833,97.373 22.606,96.146 22.606,90.678 ; v1(35.052,54.229) 34.961,54.138 32.44,54.138 24.456,54.138 23.999,54.138 S1.1@23.749,53.888 ; LED5.2 52.434,56.371 52.434,55.135 v1(52.451,55.118) ; v1(52.451,52.705) 52.48,52.676 52.48,51.561 52.451,51.532 LED4.2 52.51,49.725 53.721,48.514 57.277,48.514 ; C10.1 52.607,94.106 52.832,94.331 52.832,94.869 53.467,95.504 55.499,95.504 ; DZ1.1 59.415,40.512 59.115,40.812 59.115,40.834 57.277,42.672 57.277,48.514 ; U4.8 U4.7 ; U3.7 59.349,50.203 59.056,49.91 C4.2 57.277,48.514 ; U6.5 68.834,42.926 v1(68.961,43.053) ; R27.1 67.503,38.302 67.728,38.077 67.728,37.504 68.021,37.211 v1(71.247,37.211) 71.247,46.736 73.279,48.768 73.279,57.531 72.263,58.547 C12.2 70.612,60.833 69.215,62.23 59.055,62.23 57.658,63.627 U5.8 57.658,82.55 57.15,83.058 48.884,83.058 47.767,84.175 47.767,89.394 C9.2 47.626,96.852 48.945,98.171 52.832,98.171 55.499,95.504 ; C11.2 v1(68.961,48.641) ; C3.2 62.103,82.296 60.96,83.439 U4.7 ; J2.19 70.866,104.902 87.549,104.902 87.676,104.775 v1(87.757,104.775) 87.757,91.395 U1.38 87.807,77.089 ; v1(85.471,71.882) 85.52,71.931 87.377,71.931 C1.2 ; C1.2@87.349,72.205 C1.2@87.524,72.38 ; C1.2@87.63,72.321 87.63,74.168 U1.1 87.807,77.089 ; v1(90.17,66.04) C2.2 ; U1.39@93.472,80.01 93.472,81.845 U1.39@95.307,81.845 ; U1.39@93.472,83.68 U1.39@95.307,83.68 ; U1.39@97.142,80.01 U1.39@95.307,80.01 ; U1.39@97.142,81.845 97.142,83.68 U1.39@95.307,83.68 ; U1.15 95.123,77.13 ; v1(109.982,102.87) 110.109,102.743 R17.2 ; v1(136.421,61.849) 136.421,93.876 140.462,97.917 157.48,97.917 158.623,96.774 ; v1(141.569,61.792) 140.843,61.792 140.913,61.722 C7.1 ; C5.1 147.574,46.609 ; U2.1 147.574,46.609 ; v1(148.463,46.609) 147.574,46.609 ; C6.1 153.542,54.991 v1(160.909,54.991) ; 22.606,63.754 22.606,70.866 ; 22.606,63.754 22.606,55.206 23.424,54.388 23.456,54.388 23.749,54.094 S1.1@23.749,53.888 ; 22.606,70.866 22.606,77.47 ; 22.606,77.47 22.606,84.074 ; 22.606,84.074 22.606,90.678 ; 55.499,95.504 57.785,93.218 61.214,93.218 62.23,92.202 U4.6 U4.7 ; 87.807,77.089 87.848,77.13 95.123,77.13 ; 95.123,77.13 95.307,77.314 U1.39@95.307,80.01 ; U1.39@95.307,80.01 U1.39@95.307,81.845 ; U1.39@95.307,81.845 U1.39@95.307,83.68
  Bottom Layer w0.5: v1(35.052,54.229) 52.324,54.229 52.451,54.356 ; v1(52.451,55.118) 52.451,54.356 ; v1(68.961,48.641) v1(68.961,43.053) 70.485,43.053 71.247,42.291 v1(71.247,37.211) ; v1(85.471,71.882) 85.471,66.929 86.36,66.04 v1(90.17,66.04) ; v1(87.757,104.775) 107.95,104.775 115.951,96.774 158.623,96.774 ; v1(136.421,61.849) 136.502,61.849 136.629,61.722 141.393,61.722 141.462,61.792 v1(141.569,61.792) 141.569,46.609 ; J1.5 160.922,54.991 160.922,53.848 ; J1.4 160.922,53.848 ; 52.451,54.356 v1(52.451,52.705) 52.451,49.784 55.626,46.609 55.626,38.227 58.166,35.687 69.723,35.687 v1(71.247,37.211) ; v1(71.247,37.211) 139.954,37.211 141.569,38.826 141.569,46.609 ; 141.569,46.609 v1(148.463,46.609) 156.753,46.609 J1.6 160.922,53.848
GPIO_0: Q2.3 R15.1 SW1.1 U1.25 | length 201.1
  Top Layer w0.5: SW1.1 32.202,50.546 v1(34.29,50.546) ; v1(47.498,50.546) 47.498,36.957 50.038,34.417 81.026,34.417 ; R15.1 85.598,60.071 85.074,60.595 85.074,61.037 Q2.3 82.042,61.087 81.026,60.071 81.026,34.417 ; U1.25 v1(104.317,94.692) ; v1(113.553,94.615) 113.553,37.607 110.363,34.417 81.026,34.417
  Bottom Layer w0.5: v1(34.29,50.546) v1(47.498,50.546) ; v1(104.317,94.692) 113.461,94.692 113.538,94.615 v1(113.553,94.615)
GPIO_2: R17.1 U1.24 | length 2.7
  Top Layer w0.5: U1.24 105.358,88.519 R17.1@108.023,88.519
GPIO_15: R16.1 U1.23 | length 3.6
  Top Layer w0.5: U1.23 105.485,87.122 108.36,87.122 108.585,86.897 R16.1
"Interrupt Key": D1.1 D2.1 D3.1 D4.1 D5.1 R8.1 U1.5 | length 107.3
  Top Layer w0.5: D5.1 v1(39.114,69.848) ; D4.1 v1(39.116,76.581) ; D3.1 v1(39.114,83.31) ; D2.1 39.114,89.914 v1(39.116,89.916) ; D1.1 37.021,96.582 39.051,96.582 R8.1 v1(39.116,97.902) ; v1(92.837,64.008) 92.837,74.295 U1.5
  Bottom Layer w0.5: v1(39.114,69.848) v1@39.116,69.85 ; v1(39.114,83.31) v1@39.116,83.312 ; v1(39.116,97.902) v1@39.116,83.312 ; v1(92.837,64.008) 76.708,64.008 73.152,67.564 40.259,67.564 39.116,68.707 v1@39.116,69.85 ; v1@39.116,69.85 v1(39.116,76.581) v1@39.116,83.312
IRQ: J2.13 U1.27 | length 53.6
  Top Layer w0.5: J2.13 63.119,105.664 66.397,108.942 93.877,108.942 101.777,101.042 U1.27
Key1: D1.2 pad.4@24.911,93.021 pad.5@31.896,93.021 R2.2 S2.1 U4.12 | length 66.9
  Top Layer w0.5: S2.1@24.583,92.873 32.567,92.873 32.74,93.045 34.925,93.045 36.784,93.045 D1.2 41.275,93.218 42.53,91.963 42.53,72.659 v1(42.672,72.517) ; v1(63.5,72.913) U4.12
  Bottom Layer w0.5: v1(42.672,72.517) 42.687,72.502 63.089,72.502 v1(63.5,72.913)
Key2: D2.2 pad.4@24.892,86.36 pad.5@31.877,86.36 R3.2 S3.1 U4.13 | length 63.3
  Top Layer w0.5: S3.1@24.583,86.269 24.755,86.441 36.784,86.441 D2.2 40.767,86.614 41.768,85.613 41.768,71.77 v1(41.91,71.628) ; v1(64.77,71.882) U4.13@64.77,80.391
  Bottom Layer w0.5: v1(41.91,71.628) 41.925,71.613 64.42,71.613 64.689,71.882 v1(64.77,71.882)
Key3: D3.2 pad.4@25.038,79.813 pad.5@32.023,79.813 R4.2 S4.1 U4.14 | length 59.7
  Top Layer w0.5: S4.1@24.583,79.665 24.755,79.837 36.784,79.837 D3.2 39.751,80.01 41.006,78.755 41.006,71.008 v1(41.148,70.866) ; v1(66.04,71.12) U4.14
  Bottom Layer w0.5: v1(41.148,70.866) 41.29,70.724 65.644,70.724 v1(66.04,71.12)
Key4: D4.2 pad.4@25.038,73.209 pad.5@32.023,73.209 R5.2 S5.1 U4.15 | length 56.1
  Top Layer w0.5: S5.1@24.583,73.061 24.693,73.171 32.567,73.171 34.925,73.171 36.847,73.171 D4.2 39.368,73.281 40.244,72.405 40.244,69.992 v1(40.259,69.977) ; v1(67.31,70.231) U4.15
  Bottom Layer w0.5: v1(40.259,69.977) 40.386,69.977 40.401,69.962 67.041,69.962 v1(67.31,70.231)
Key5: D5.2 pad.4@25.038,66.478 pad.5@32.023,66.478 R6.2 S6.1 U4.1 | length 74.7
  Top Layer w0.5: S6.1@24.583,66.33 24.692,66.439 34.925,66.439 36.848,66.439 D5.2 v1(39.116,66.548) ; U4.1 v1(68.58,87.234) ; v1(72.894,66.544) 72.913,66.563 72.913,87.107 v1@72.898,87.122
  Bottom Layer w0.5: v1(39.116,66.548) 39.118,66.546 72.892,66.546 v1(72.894,66.544) ; v1(68.58,87.234) v1(72.913,87.234)
LED1: R9.2 U5.2 | length 16.2
  Top Layer w0.5: U5.2 50.038,67.564 51.308,66.294 R9.2
LED2: R10.2 U5.1 | length 16
  Top Layer w0.5: U5.1 48.768,67.31 49.53,66.548 R10.2
LED3: R11.2 U5.15 | length 29.4
  Top Layer w0.5: v1(46.863,88.011) 46.863,65.483 47.45,64.896 R11.2@47.752,64.896 ; U5.15 50.038,87.93 50.165,88.057 v1(50.165,88.138)
  Bottom Layer w0.5: v1(46.863,88.011) 50.038,88.011 v1(50.165,88.138)
NetC6_2: C6.2 U2.4 | length 2.7
  Top Layer w0.5: U2.4 C6.2@150.243,53.086
NetC7_2: C7.2 U2.7 Y1.1 | length 11.4
  Top Layer w0.5: U2.7 148.971,56.896 149.986,57.911 C7.2 149.986,64.905 149.486,65.405 Y1.1
NetC8_2: C8.2 U2.8 Y1.2 | length 19.2
  Top Layer w0.5: Y1.2 139.312,65.405 138.812,64.905 C8.2 138.96,61.574 138.96,60.684 139.446,60.198 148.59,60.198 149.098,59.69 149.098,58.547 148.717,58.166 U2.8
NetC10_2: C10.2 D7.1 R19.2 U5.13 | length 10.7
  Top Layer w0.5: D7.1 50.481,92.519 52.451,92.519 54.293,92.519 R19.2 ; C10.2 52.561,92.346 52.561,85.793 U5.13
NetC12_1: C12.1 D8.1 R29.2 U3.13 | length 11.9
  Top Layer w0.5: U3.13 65.981,56.57 66.857,56.57 67.565,57.278 68.962,57.278 C12.1 ; 68.961,57.277 71.283,57.277 71.575,56.984 71.575,55.933 71.755,55.753 71.755,53.713 71.462,53.421 70.692,53.421 R29.2@70.611,53.34
NetD6_2: D6.2 U2.2 | length 3
  Top Layer w0.5: U2.2 D6.2@150.018,50.546 ; D6.2@150.145,49.53 150.495,49.88 D6.2
NetD8_2: D8.2 R29.1 U3.10 U6.4 | length 20.3
  Top Layer w0.5: U6.4 62.323,42.926 63.373,43.976 63.373,52.197 63.919,52.743 U3.10 68.736,52.743 68.961,52.968 R29.1 68.834,53.213 68.834,55.499 D8.2
NetDZ1_2: DZ1.2 R23.2 R24.1 R26.2 U6.6 | length 21.1
  Top Layer w0.5: R23.2 57.44,38.302 57.665,38.077 57.665,37.377 57.957,37.084 59.562,37.084 DZ1.2 ; DZ1.2@59.649,36.957 v1(61.976,36.957) R24.1 ; v1(64.277,44.196) U6.6 ; v1(65.659,36.957) 65.659,38.048 65.786,38.175 R26.2
  Bottom Layer w0.5: v1(61.976,36.957) 64.262,36.957 ; v1(64.277,44.196) 64.262,44.181 64.262,36.957 ; v1(65.659,36.957) 64.262,36.957
NetDZ2_2: DZ2.2 R26.1 R27.2 R28.2 U6.7 | length 14.8
  Top Layer w0.5: R28.2 63.919,39.914 65.659,39.914 67.437,39.914 69.559,39.914 69.596,39.877 69.677,39.877 69.977,40.177 69.977,44.577 69.088,45.466 U6.7
NetLED1_1: LED1.1 R9.1 | length 30.6
  Top Layer w0.5: v1@51.308,61.087 R9.1
  Bottom Layer w0.5: LED1.1 27.67,58.944 49.165,58.944 v1@51.308,61.087
  other v1: 51.308,61.214
NetLED2_1: LED2.1 R10.1 | length 24
  Top Layer w0.5: v1(49.53,61.214) R10.1@49.53,63.119
  Bottom Layer w0.5: LED2.1 30.599,59.698 48.014,59.698 v1@49.276,60.96
NetLED3_1: LED3.1 R11.1 | length 18.5
  Top Layer w0.5: R11.1 47.498,63.119 47.752,62.865 v1(47.752,61.214)
  Bottom Layer w0.5: LED3.1 33.528,60.452 46.863,60.452 47.625,61.214 v1(47.752,61.214)
NetLED4_1: LED4.1 R21.2 | length 1.8
  Top Layer w0.5: LED4.1 R21.2
NetLED5_1: LED5.1 R30.2 | length 2
  Top Layer w0.5: LED5.1 56.427,56.388 R30.2
NetQ1_1: Q1.1 R7.2 | length 2.7
  Top Layer w0.5: R7.2 83.961,65.785 84.013,65.837 Q1.1
NetQ2_1: Q2.1 R12.2 | length 2.8
  Top Layer w0.5: Q2.1 85.974,63.862 86.247,64.135 R12.2
NetR20_2: R20.2 U3.9 U6.1 | length 19.1
  Top Layer w0.5: v1(58.547,46.736) U6.1 ; U3.9 v1@67.856,51.473 ; v1(67.818,51.435) v1@67.856,51.473 ; v1@67.945,51.562 v1@67.856,51.473 ; R20.2 68.961,51.248 68.736,51.473 v1@67.856,51.473
  Bottom Layer w0.5: v1(58.547,46.736) 67.437,46.736 67.818,47.117 v1(67.818,51.435)
NetR21_1: R21.1 U3.6 | length 2.7
  Top Layer w0.5: R21.1 U3.6
NetR30_1: R30.1 U3.2 U3.11 | length 10
  Top Layer w0.5: R30.1 58.149,56.536 60.765,56.536 U3.2 v1(63.284,56.553) ; v1(64.173,54.013) U3.11
  Bottom Layer w0.5: v1(63.284,56.553) 63.284,54.928 64.173,54.039 v1(64.173,54.013)
NetU3_3: U3.3 U3.8 | length 9.1
  Top Layer w0.5: U3.3 v1(62.38,55.283) ; v1(64.389,50.18) 64.401,50.192 65.952,50.192 U3.8
  Bottom Layer w0.5: v1(62.38,55.283) 62.38,52.174 64.374,50.18 v1(64.389,50.18)
NetU3_12: U3.12 U6.2 U6.3 | length 16.7
  Top Layer w0.5: U6.2 U6.3 62.103,44.196 62.611,44.704 62.611,53.975 63.919,55.283 U3.12
RES: J2.14 U1.16 | length 90.5
  Top Layer w0.5: J2.14 63.119,102.889 61.915,104.093 61.915,105.928 65.715,109.728 105.029,109.728 112.664,102.093 112.664,97.416 112.649,97.401 v1(112.649,78.359) ; U1.16 106.893,78.4 v1(106.934,78.359)
  Bottom Layer w0.5: v1(106.934,78.359) v1(112.649,78.359)
RS485_out1: J2.3 R22.1 R23.1 | length 79.4
  Top Layer w0.5: v1(45.222,39.995) 45.205,40.012 45.205,96.945 49.215,100.955 49.215,103.425 50.419,104.629 J2.3 ; v1(54.028,39.952) R22.1 R23.1
  Bottom Layer w0.5: v1(45.222,39.995) 53.985,39.995 v1(54.028,39.952)
RS485_out2: J2.4 R28.1 R31.2 | length 93.6
  Top Layer w0.5: J2.4 50.419,100.711 45.959,96.251 45.959,87.637 45.982,87.614 45.982,61.706 47.744,59.944 49.403,59.944 ; R31.2 49.403,59.944 ; R28.1 63.881,36.449 63.365,35.933 50.655,35.933 49.403,37.185 49.403,59.944
RSTN: U1.26
RTS: Q1.2 R12.1 U2.14 | length 69.4
  Top Layer w0.5: Q1.2 85.913,65.837 85.963,65.787 86.388,65.787 86.39,65.785 R12.1 88.49,65.56 89.126,65.56 90.805,63.881 90.805,51.831 v1(90.82,51.816) ; v1(140.081,51.816) U2.14
  Bottom Layer w0.5: v1(90.82,51.816) v1(140.081,51.816)
RXD485: R22.2 U1.10 U3.4 U3.5 | length 93.2
  Top Layer w0.5: R22.2 51.233,38.302 50.292,39.243 50.292,52.959 51.346,54.013 v1@57.393,54.013 ; v1(57.393,53.986) v1@57.393,54.013 ; v1@57.393,54.037 v1@57.393,54.013 ; U3.5 U3.4 v1@57.393,54.013 ; U1.10 99.314,74.268 v1(99.314,60.198)
  Bottom Layer w0.5: v1(57.393,53.986) 57.404,53.975 57.404,59.055 58.547,60.198 v1(99.314,60.198)
RXD_MCU: D6.1 R18.2 U1.34 | length 107.3
  Top Layer w0.5: v1(92.837,92.822) 92.862,92.797 92.862,91.37 U1.34 ; R18.2 152.201,47.625 152.243,47.667 153.204,47.667 153.67,48.133 D6.1@153.67,49.786 ; v1(153.67,53.213) D6.1@153.67,49.786 ; D6.1 D6.1@153.67,49.786
  Bottom Layer w0.5: v1(92.837,92.822) 92.837,92.329 93.599,91.567 151.384,91.567 153.67,89.281 v1(153.67,53.213)
SCL: "lcd oled.2" R14.1 U1.36 | length 79.6
  Top Layer w0.5: R14.1@90.297,95.25 R14.1 90.322,94.971 90.322,91.42 90.297,91.395 U1.36
  Bottom Layer w0.5: v1(90.324,93.726) 113.149,93.726 113.164,93.711 162.291,93.711 163.703,95.123 163.703,96.774
SCLK: J2.15 U1.30 | length 45.7
  Top Layer w0.5: J2.15 65.659,105.429 67.664,107.434 91.321,107.434 97.967,100.788 U1.30
SDA: "lcd oled.1" R13.2 U1.33 | length 78.8
  Top Layer w0.5: U1.33 94.132,91.37 94.196,91.434 94.196,94.958 R13.2
  Bottom Layer w0.5: v1@94.132,92.812 94.179,92.765 94.402,92.765 94.456,92.71 164.338,92.71 166.243,94.615 166.243,96.774
  other v1: 94.132,92.822
SH_CP: U1.12 U5.11 | length 121.3
  Top Layer w0.5: U5.11 v1(55.118,89.027) ; v1(76.073,46.101) v1(76.073,89.042) ; v1(101.727,45.974) 101.727,74.295 U1.12
  Bottom Layer w0.5: v1(55.118,89.027) 55.133,89.042 66.414,89.042 66.429,89.027 76.058,89.027 v1(76.073,89.042) ; v1(76.073,46.101) 76.2,45.974 v1(101.727,45.974)
ST_CP: U1.8 U5.12 | length 114.2
  Top Layer w0.5: U5.12 v1(53.848,89.901) ; v1(75.057,48.514) v1(75.057,89.931) ; v1(96.647,48.641) 96.697,48.691 U1.8
  Bottom Layer w0.5: v1(53.848,89.901) 53.905,89.958 54.118,89.958 54.202,90.043 74.864,90.043 74.976,89.931 v1(75.057,89.931) ; v1(75.057,48.514) 75.065,48.522 96.528,48.522 v1(96.647,48.641)
TXD485: R25.2 R31.1 U1.11 U3.1 | length 61.1
  Top Layer w0.5: R31.1 R25.2 58.039,58.048 58.264,57.823 U3.1 60.706,57.899 v1(60.706,61.102) ; U1.11 100.584,74.268 v1(100.584,61.214)
  Bottom Layer w0.5: v1(60.706,61.102) 100.472,61.102 v1(100.584,61.214)
TXD_MCU: U1.35 U2.3 | length 107.2
  Top Layer w0.5: v1(91.567,92.822) 91.592,92.797 91.592,91.37 U1.35 ; U2.3 v1(152.766,51.816)
  Bottom Layer w0.5: v1(91.567,92.822) 91.567,92.075 92.837,90.805 151.08,90.805 152.766,89.119 v1(152.766,51.816)
pads on no net: DZ1.0 DZ2.0 J1.1 M1.S M2.S M3.S M4.S U1.7 U1.14 U1.17 U1.18 U1.19 U1.20 U1.21 U1.22 U1.32 U2.9 U2.10 U2.11 U2.12 U2.15 U4.4 U5.9
copper on no net:
  other v2: 37.719,34.925 39.243,34.925 40.64,34.925 167.894,43.942 167.894,45.466 167.894,46.863 167.894,87.122 167.894,88.646 167.894,90.043 39.497,108.458 41.021,108.458 42.418,108.458 147.574,108.458 149.098,108.458 150.495,108.458

## Polygon pours and split planes (outlines as drawn)
GND on Top Layer "GND_L01_P001" (solid, remove dead copper, pour order 1): 28.575,33.655 28.575,40.513 21.717,40.513 21.717,103.251 28.829,103.251 28.829,110.236 162.217,110.236 162.217,103.378 169.164,103.378 169.164,40.513 162.306,40.513 162.306,33.655
no net on Top Layer "NONET_L01_P000" (solid, pour order 0): 93.091,84.074
GND on Bottom Layer "GND_L02_P002" (solid, remove dead copper, pour order 2): 28.575,33.655 28.575,40.513 21.717,40.513 21.717,103.251 28.829,103.251 28.829,110.236 162.217,110.236 162.217,103.378 169.164,103.378 169.164,40.513 162.306,40.513 162.306,33.655

## Other copper
Top Layer:
  rectangle net GND: 92.837,79.375 97.79,84.328
  region net DIN: 60.452,102.362
  region: 51.308,80.264

## Silkscreen, mask and mechanical layers (free items; w line width, h text height)
Top Overlay:
  lines w0.547: 23.125,48.177 34.072,48.177 34.072,98.8 23.125,98.8 23.125,48.177 ; 156.929,48.177 167.876,48.177 167.876,98.8 156.929,98.8 156.929,48.177
Mechanical 1:
  drawing of 1463 lines, arcs and shapes, not listed

## Text inside footprints (layer, text, board x,y; h text height)
J2: Bottom Overlay "2" at 44.45,103.073 h1 r180; Bottom Overlay "1" at 44.78,105.664 h1 r180
U1: Mechanical 13 "ANTENNA" at 84.067,76.845 h1.78 r90